# Altium PCB Emstat_system.PcbDoc
Units mil, origin at the board's own origin, x right, y up, seen from the top; angles counter-clockwise.
Board outline 2520 x 1700 mil, 2 copper layers (Top Layer, Bottom Layer); 40 components, 75 nets, 189 pads, 43 vias.
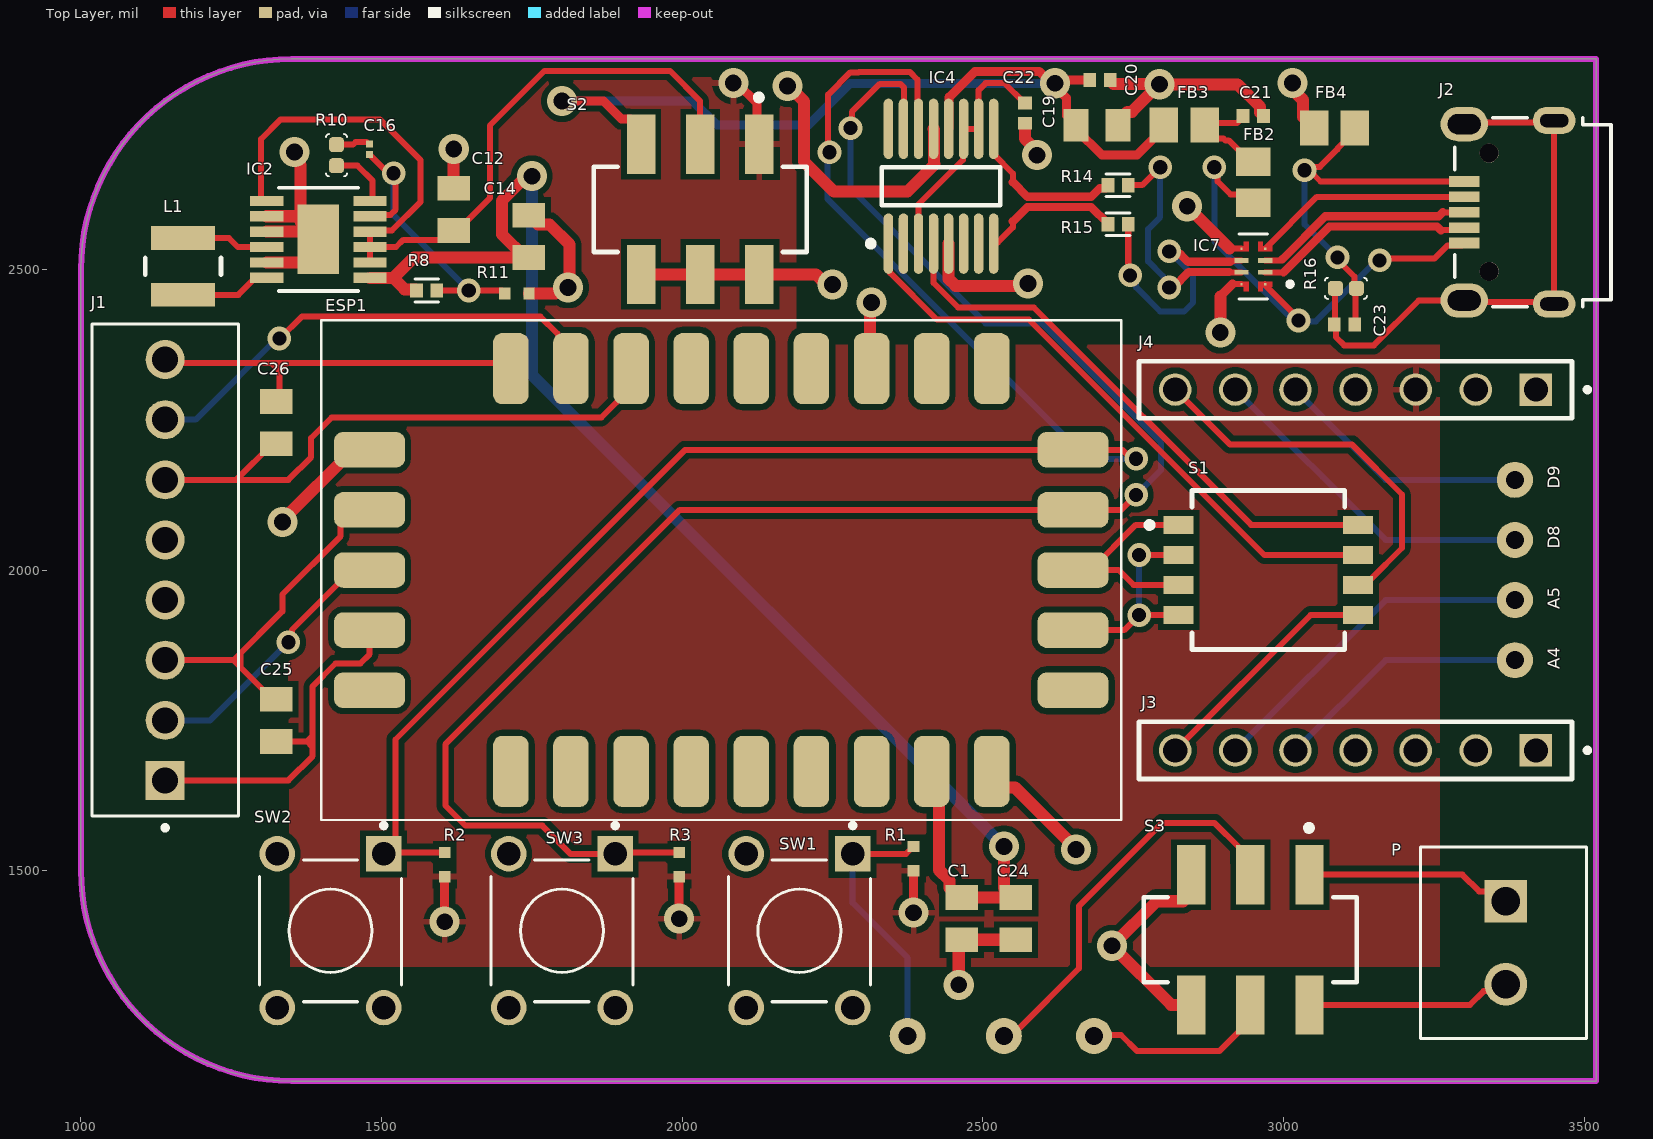
[diagram p0: Top Layer view]
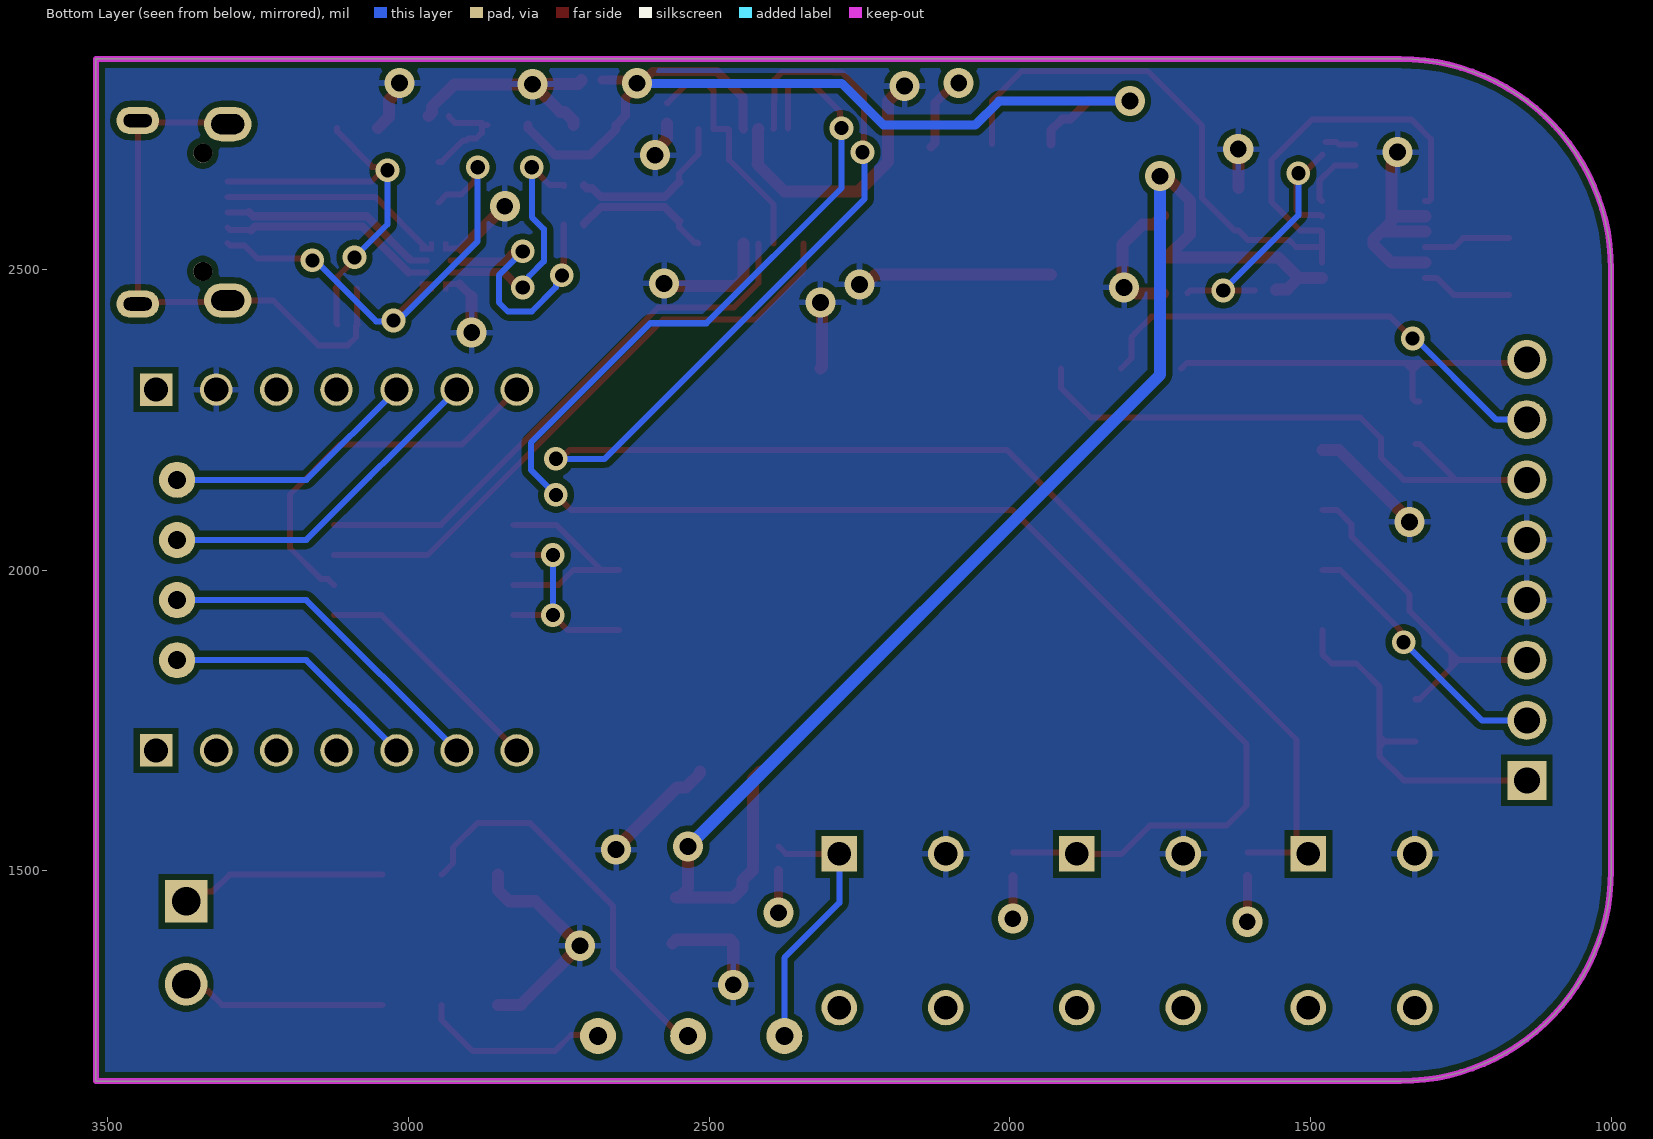
[diagram p1: Bottom Layer view, seen from below]
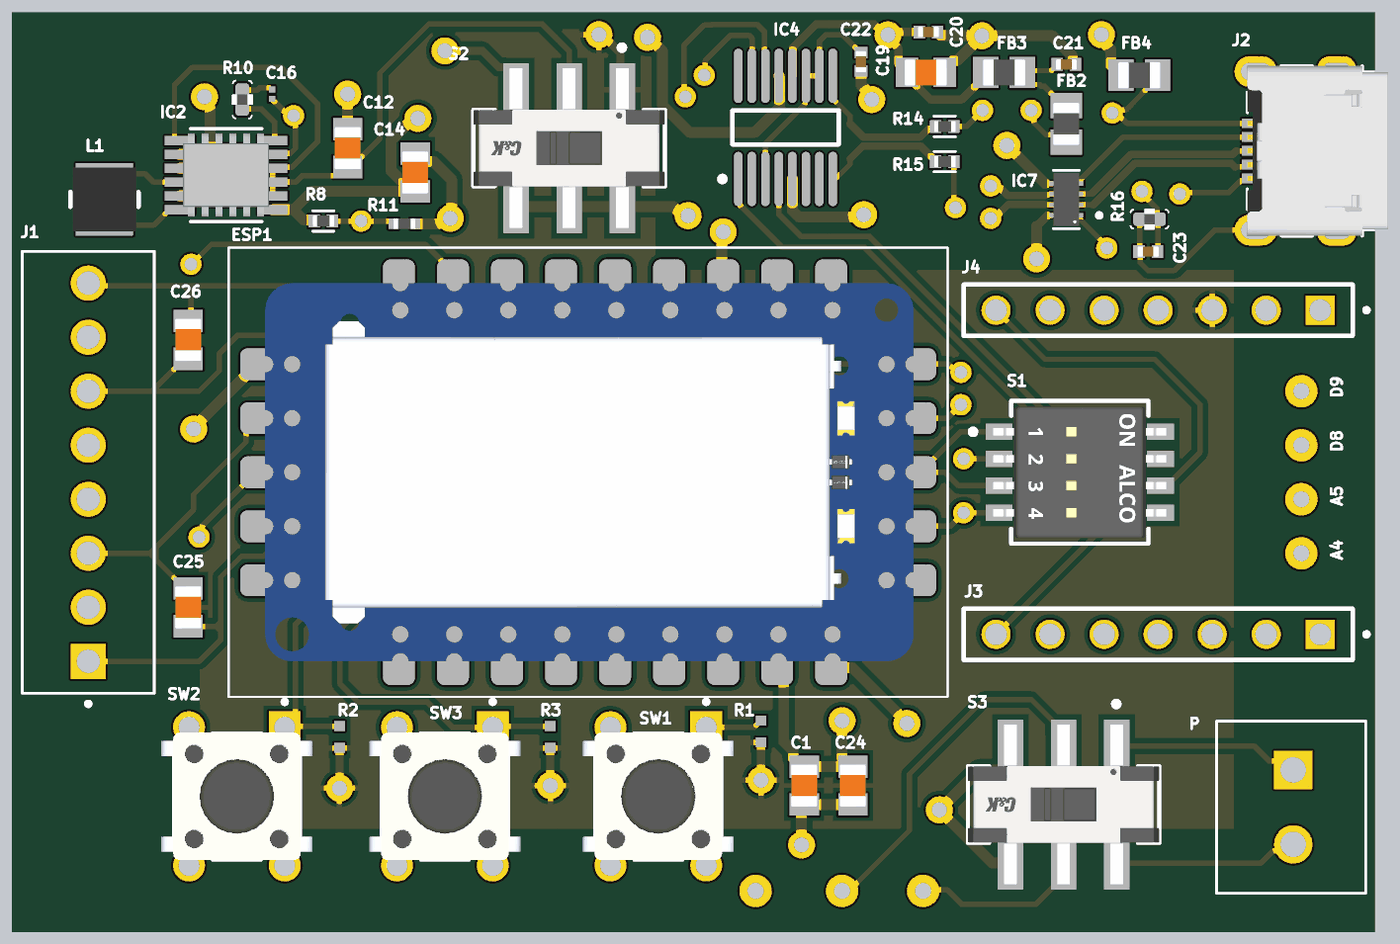
[diagram p2: 3D render of the assembled board from above, using the file's embedded part models]

## Layer stack, top to bottom
Top Solder: solder mask 0.4, Solder Resist, Dk 3.5
Top Layer: signal copper 1.4
Dielectric 1: dielectric 12.6, FR-4, Dk 4.8
Bottom Layer: signal copper 1.4
Bottom Solder: solder mask 0.4, Solder Resist, Dk 3.5

## Board outline
1350,1150 cw(c1350,1500) 1000,1500 1000,2500 cw(c1350,2500) 1350,2850 3520,2850 3520,1150

## Design rules (kind name [scope] priority, off if disabled: settings)
Clearance Clearance_1 [All] p1: gap=5 ignorepadtopadclearanceinfootprint=FALSE
Clearance [All] p2: gap=3 ignorepadtopadclearanceinfootprint=FALSE
MinimumSolderMaskSliver [All] p1: minsoldermaskwidth=5
PolygonConnect [All] p1: connectstyle=Relief reliefconductorwidth=10 reliefentries=4 polygonreliefangle="90 Angle" airgapwidth=10
RoutingVias [All] p1: holewidth=23.62 width=39.37 viastyle="Through Hole" minholewidth=23.62 minwidth=39.37 maxholewidth=23.62 maxwidth=39.37
ShortCircuit ShortCircuit_1 [All] p1: allowed=FALSE
ShortCircuit [Not InAnyNet vs Not InAnyNet] p2: allowed=TRUE
SilkToSilkClearance [All] p1: silktosilkclearance=5
SilkToSolderMaskClearance [IsPad] p1: minsilkscreentomaskgap=5 clearancetoexposedcopper=TRUE
SolderMaskExpansion [All] p1: expansion=4 istentingtop=FALSE
Width [All] p1: maxlimit=30 minlimit=10 preferedwidth=10
26 further rules are at their usual default settings.

## Components (designator, comment, footprint, x,y, rotation, side; value= is the part's Value field where it differs from the comment)
C1 "CL21A106KPCLQNC" CAPC2012X95N 2465,1420.04 r270 top
C12 "CL21A106KPCLQNC" CAPC2012X95N 1620,2600 r90 top
C14 "CL21A106KPCLQNC" CAPC2012X95N 1745,2555 r90 top
C16 "GRM022R61A102KE19L" CAPC0402X22N 1480,2700 r270 top
C19 "CL21A106KPCLQNC" CAPC2012X95N 2690,2740 r0 top
C20 "CL05A104KP5NNNC" CAPC1005X55N 2695,2815 r0 top
C21 "LMK105BJ105KV-F" CAPC1005X55N 2950,2755 r180 top
C22 "CL05A104KP5NNNC" CAPC1005X55N 2570,2760 r270 top
C23 "CL05A104KP5NNNC" CAPC1005X55N 3101.5,2408.5 r180 top
C24 "CL21A106KPCLQNC" CAPC2012X95N 2555,1420.04 r270 top
C25 "CL21A106KPCLQNC" CAPC2012X95N 1325,1750 r90 top
C26 "CL21A106KPCLQNC" CAPC2012X95N 1325,2245 r270 top
ESP1 "EmStat Pico" EmstatPico 2065,2000 r180 top
FB2 "MPZ2012S601AT000" BEADC2012X105N 2950,2645 r90 top
FB3 "MPZ2012S601AT000" BEADC2012X105N 2835,2740 r180 top
FB4 "MPZ2012S601AT000" BEADC2012X105N 3085,2735 r180 top
IC2 "LTC3536EMSE#PBF" MSOP-12_MSE 1395,2550 r0 top
IC4 "" SSOP-16_M 2430.55,2638.33 r90 top
IC7 "ECMF02-4CMX8" FIL_ECMF02-4CMX8 2950,2505 r180 top
J1 "1725711" PHOENIX_1725711 1262.05,1590.94 r90 top
J2 "629105150521" 629105150521 3415,2595 r90 top
J3 "ESQ-107-12-T-S" SAMTEC_ESQ-107-12-T-S 3420,1700 r180 top locked
J4 "ESQ-107-12-T-S" SAMTEC_ESQ-107-12-T-S 3420,2300 r180 top locked
L1 "4.7uH, 1.3A" WE-LQS_3015 1170,2505 r90 top
P "OSTTE020104" OST_OSTTE020104 3370,1380 r270 top
R1 "ERJ2RKF4702X" RES_ERJ2RKF4702X 2385,1520 r270 top
R2 "ERJ2RKF4702X" RES_ERJ2RKF4702X 1605,1510 r270 top
R3 "ERJ2RKF4702X" RES_ERJ2RKF4702X 1995,1510 r270 top
R8 "ERJ-2RKF4992X" RESC1005X40 1575,2465 r180 top
R10 "SMD-RES-100K-5%-1/16W(0402)" R0402 1425,2690 r180 top
R11 "ERJ2RKF1002X" RES_ERJ2RKF1002X 1725,2460 r180 top
R14 "RC0402FR-0727RL" RESC1005X40 2725,2640 r180 top
R15 "RC0402FR-0727RL" RESC1005X40 2725,2575 r180 top
R16 "SMD-RES-100K-5%-1/16W(0402)" R0402 3104,2468.5 r90 top
S1 "" FP-1571983-4-MFG 2975,2000 r270 top
S2 "" FP-JS202011SCQN-MFG 2030,2600 r180 top
S3 "" FP-JS202011SCQN-MFG 2945,1385 r180 top
SW1 "1825910-6" SW_1825910-6-4 2195,1400 r270 top
SW2 "1825910-6" SW_1825910-6-4 1415,1400 r270 top
SW3 "1825910-6" SW_1825910-6-4 1800,1400 r270 top

## Footprints (in the part's own frame and the unit in brackets; to place one, negate y for a bottom-side part, rotate by r counter-clockwise, add the part's x,y. Pads: shape width x height; smd on the part's side, far side on the other; paste and mask are expansions set on the pad)
629105150521 [mm] "Micro USB 2.0 SMT Type B Horizontal 5 Contacts High Current"
  rect 0.45x1.3 smd: 1(-1.3,2.9) 2(-0.65,2.9) 3(0,2.9) 4(0.65,2.9) 5(1.3,2.9)
  round 0.8 hole 0.8 unplated: MH1(-2.5,1.85) MH2(2.5,1.85)
  oval 1.15x1.8 hole 0.55 slot 1.2 at 90 deg: Shell(-3.875,-0.9) Shell(3.875,-0.9)
  oval 1.45x2 hole 0.85 slot 1.4 at 90 deg: Shell(-3.725,2.9) Shell(3.725,2.9)
  silkscreen extent -4,-3.3 4,3.3, body extent -4,-3.3 4,3.3, height 2.75
BEADC2012X105N [mm]
  rect 1.2x1.47 smd: 1(-0.86,0) 2(0.86,0)
  body extent -1,-0.63 1,0.63, height 1.05
CAPC0402X22N [mm]
  rect 0.29x0.3 smd: 1(-0.222,0) 2(0.222,0)
CAPC1005X55N [mm]
  rect 0.54x0.6 smd: 1(-0.432,0) 2(0.432,0)
  body extent -0.5,-0.25 0.5,0.25, height 0.55
CAPC2012X95N [mm]
  rect 1.05x1.38 smd: 1(-0.89,0) 2(0.89,0)
  body extent -1,-0.63 1,0.63, height 0.95
EmstatPico [mm] "EmStat Pico LandPattern"
  rrect50% 3x1.5 smd: 1(-14.859,5.08) 2(-14.859,2.54) 3(-14.859,0) 4(-14.859,-2.54) 5(-14.859,-5.08) 15(14.859,-5.08) 16(14.859,-2.54) 17(14.859,0) 18(14.859,2.54) 19(14.859,5.08)
  rrect50% 1.5x3 smd: 6(-11.43,-8.509) 7(-8.89,-8.509) 8(-6.35,-8.509) 9(-3.81,-8.509) 10(-1.27,-8.509) 11(1.27,-8.509) 12(3.81,-8.509) 13(6.35,-8.509) 14(8.89,-8.509) 20(8.89,8.509) 21(6.35,8.509) 22(3.81,8.509) 23(1.27,8.509) 24(-1.27,8.509) 25(-3.81,8.509) 26(-6.35,8.509) 27(-8.89,8.509) 28(-11.43,8.509)
  silkscreen extent -16.9,-10.56 16.9,10.56, body extent -15.3,-8.89 15.18,8.89, height 2.6
FIL_ECMF02-4CMX8 [mm]
  rect 0.1x0.1 smd paste-1 mask+0: 1(-0.5,0.75) 4(-0.5,-0.75) 5(0.5,-0.75) 8(0.5,0.75)
  rect 0.6x0.2 smd: 2(-0.5,0.25) 3(-0.5,-0.25) 6(0.5,-0.25) 7(0.5,0.25)
  Top Layer region: -0.2,0.65 -0.8,0.65 -0.8,0.85 -0.4,0.85 -0.4,1.05 -0.2,1.05
  Top Layer region: 0.4,0.85 0.8,0.85 0.8,0.65 0.2,0.65 0.2,1.05 0.4,1.05
  Top Layer region: -0.2,-1.05 -0.4,-1.05 -0.4,-0.85 -0.8,-0.85 -0.8,-0.65 -0.2,-0.65
  Top Layer region: 0.8,-0.85 0.4,-0.85 0.4,-1.05 0.2,-1.05 0.2,-0.65 0.8,-0.65
  silkscreen extent -1.65,-1.37 0.6,1.37, body extent -0.6,-1.25 0.6,1.25, height 0.6
FP-1571983-4-MFG [mm]
  rect 0.76x1.27 smd paste+0 mask+0: 1(-1.905,-3.795) 1-1(-1.905,3.795) 2(-0.635,-3.795) 2-1(-0.635,3.795) 3(0.635,-3.795) 3-1(0.635,3.795) 4(1.905,-3.795) 4-1(1.905,3.795)
  silkscreen extent -3.35,-5.14 3.35,3.22, body extent -3.45,-4.53 3.45,4.53, height 0.25
FP-JS202011SCQN-MFG [mm]
  rect 1.2x2.5 smd paste+0 mask+0: 1(-2.5,-2.75) 2(0,-2.75) 3(2.5,-2.75) 4(-2.5,2.75) 5(0,2.75) 6(2.5,2.75)
  silkscreen extent -4.5,-4.85 4.5,1.8, body extent -4.6,-4.1 4.6,4.1, height 0.25
MSOP-12_MSE [mil]
  rect 55x17 smd: 1(-86,64) 2(-86,38.4) 3(-86,12.8) 4(-86,-12.8) 5(-86,-38.4) 6(-86,-64) 7(86,-64) 8(86,-38.4) 9(86,-12.8) 10(86,12.8) 11(86,38.4) 12(86,64)
  rect 69x116 smd paste-78.74: 13(0,0)
  silkscreen extent -66,-86 66,86, body extent -80,-96 80,96, height 17
OST_OSTTE020104 [mm]
  rect 1.8x1.8 hole 1.2: 1(-1.75,0)
  round 1.8 hole 1.2: 2(1.75,0)
  silkscreen extent -4.05,-3.6 4.05,3.4
PHOENIX_1725711 [mm]
  rect 1.65x1.65 / inner round 1.65 / far side rect 1.65x1.65 hole 1.1: 1(1.5,3.1)
  round 1.65 hole 1.1: 2(4.04,3.1) 3(6.58,3.1) 4(9.12,3.1) 5(11.66,3.1) 6(14.2,3.1) 7(16.74,3.1) 8(19.28,3.1)
  silkscreen extent -0.6,0 20.78,6.2
R0402 [mil]
  rrect50% 25x25 smd: 1(0,17.5) 2(0,-17.5)
  silkscreen extent -18,-35 18,35, body extent -20,-10 20,10, height 16
RES_ERJ2RKF1002X [mm]
  rect 0.475x0.5 smd: 1(-0.512,0) 2(0.512,0)
  body extent -0.5,-0.25 0.5,0.25, height 0.35
RES_ERJ2RKF4702X [mm]
  rect 0.475x0.5 smd: 1(-0.512,0) 2(0.512,0)
RESC1005X40 [mm]
  rect 0.54x0.6 smd: 1(-0.43,0) 2(0.43,0)
  silkscreen extent -0.5,-0.48 0.5,0.48, body extent -0.5,-0.25 0.5,0.25, height 0.35
SAMTEC_ESQ-107-12-T-S [mm]
  rect 1.37x1.37 hole 1.02: 01(0,0)
  round 1.37 hole 1.02: 02(2.54,0) 03(5.08,0) 04(7.62,0) 05(10.16,0) 06(12.7,0) 07(15.24,0)
  silkscreen extent -2.27,-1.2 16.77,1.2
SSOP-16_M [mm] "SOP, 16-Leads, Body 4.9x3.9mm, Pitch 0.635mm, IPC Low Density"
  oval 2.55x0.4 smd: 1(-2.425,2.222) 2(-2.425,1.587) 3(-2.425,0.952) 4(-2.425,0.317) 5(-2.425,-0.318) 6(-2.425,-0.953) 7(-2.425,-1.588) 8(-2.425,-2.222) 9(2.425,-2.222) 10(2.425,-1.587) 11(2.425,-0.952) 12(2.425,-0.317) 13(2.425,0.318) 14(2.425,0.953) 15(2.425,1.588) 16(2.425,2.222)
  silkscreen extent -2.55,-2.5 0.8,3.1, body extent -1.99,-2.5 1.99,2.5, height 1.76
SW_1825910-6-4 [mm]
  rect 1.498x1.498 / inner round 1.498 / far side rect 1.498x1.498 hole 0.99: 1(-3.25,2.25)
  round 1.498 hole 0.99: 2(3.25,2.25) 3(-3.25,-2.25) 4(3.25,-2.25)
  silkscreen extent -4.54,-3 3,3, body extent -3,-3.9 3,3.9, height 5.01
WE-LQS_3015 [mm] "SMD Power Inductor, 2-Leads, body 3x3mm"
  rect 1x2.7 smd: 1(-1.2,0) 2(1.2,0)
  silkscreen extent -0.35,-1.6 0.35,1.6, body extent -1.5,-1.5 1.5,1.5, height 1.5

## Part data
C1 C12 C14 C19 C24 C25 C26: "10 ÂµF Â±10% 10V Ceramic Capacitor X5R 0805 (2012 Metric)", Package=Package, Check_prices=https://www.snapeda.com/parts/CL21A106KPCLQNC/Samsung/view-part/?ref=eda, Digi-Key_Part_Number=1276-2402-2-ND, MF=Samsung, MP=CL21A106KPCLQNC, Purchase-URL=https://pricing.snapeda.com/search/part/CL21A106KPCLQNC/?ref=eda, SnapEDA_Link=https://www.snapeda.com/parts/CL21A106KPCLQNC/Samsung/view-part/?ref=snap
C16 J1 J3 J4 R1 R2 R3: Package=None, Availability=Unavailable, Price=None
  C16: MP=GRM022R61A102KE19L
  J1: MF="Phoenix Contact", MP=1725711
  J3 J4: MP=ESQ-107-12-T-S
  R1 R2 R3: MP=ERJ2RKF4702X
C20 C22 C23: "0.1ÂµF Â±10% 10V Ceramic Capacitor X5R 0402 (1005 Metric)", Package="0402 Samsung", Availability=Good, Check_prices=https://www.snapeda.com/parts/CL05A104KP5NNNC/Samsung%20Electro-Mechanics/view-part/3598286/?ref=eda, MF="Samsung Electro-Mechanics", MP=CL05A104KP5NNNC, Price=None, Purchase-URL=https://pricing.snapeda.com/search/part/CL05A104KP5NNNC/?ref=eda, SnapEDA_Link=https://www.snapeda.com/parts/CL05A104KP5NNNC/Samsung%20Electro-Mechanics/view-part/3598286/?ref=snap
  C22: Supplier 1=Avnet, Supplier Part Number 1=CL05A104KP5NNNC
C21: "1ÂµF Â±10% 10V Ceramic Capacitor X5R 0402 (1005 Metric)", Package="1005 Taiyo Yuden", Availability=Good, Check_prices=https://www.snapeda.com/parts/LMK105BJ105KV-F/Taiyo%20Yuden/view-part/1836611/?ref=eda, MF="Taiyo Yuden", MP=LMK105BJ105KV-F, Price=None, Purchase-URL=https://pricing.snapeda.com/search/part/LMK105BJ105KV-F/?ref=eda, SnapEDA_Link=https://www.snapeda.com/parts/LMK105BJ105KV-F/Taiyo%20Yuden/view-part/1836611/?ref=snap
FB2 FB3 FB4: "600 Ohms @ 100MHz 1 Power Line Ferrite Bead 0805 (2012 Metric) 2A 100mOhm", Package="0805 TDK", Availability=Good, Check_prices=https://www.snapeda.com/parts/MPZ2012S601AT000/TDK-Lambda%20Americas%20Inc/view-part/259003/?ref=eda, MF=TDK, MP=MPZ2012S601AT000, Price=None, Purchase-URL=https://pricing.snapeda.com/search/part/MPZ2012S601AT000/?ref=eda, SnapEDA_Link=https://www.snapeda.com/parts/MPZ2012S601AT000/TDK-Lambda%20Americas%20Inc/view-part/259003/?ref=snap
IC2: "1A Low Noise, Buck-Boost DC/DC Converter", Package="MSOP -12 Analog Devices", Availability="In Stock", Check_prices=https://www.snapeda.com/parts/LTC3536EMSE%23PBF/Analog+Devices/view-part/?ref=eda, MF="Analog Devices", MP=LTC3536EMSE#PBF, Price=None, Purchase-URL=https://pricing.snapeda.com/search/part/LTC3536EMSE#PBF/?ref=eda, SnapEDA_Link=https://www.snapeda.com/parts/LTC3536EMSE%23PBF/Analog+Devices/view-part/?ref=snap
IC4: library part CMP-0248-00025-2, "USB to Basic UART Interface Chip, UHCI/OHCI/EHCI Compatible, USB 2.0 Compatible, -40 to +85 degC, 16-Pin SSOP, Pb-Free, Tube", Manufacturer=FTDI, PartNumber=FT230XS-U, Supplier Part Number 1=768-1154-5-ND, Code_JEDEC=MO-137-AB, ComponentLink1Description="Manufacturer URL", ComponentLink1URL=http://www.ftdichip.com/, ComponentLink2Description=Datasheet, ComponentLink2URL=http://www.ftdichip.com/Support/Documents/DataSheets/ICs/DS_FT230X.pdf, ComponentLink3Description="FT230X Product Page", ComponentLink3URL=www.ftdichip.com/Products/ICs/FT230X.html, DatasheetVersion="ver 1.2, Feb-2013", PackageDescription="16-Pin Small Outline Package, 8.6 x 3.9 mm Body, 0.635 mm Pitch", PackageReference=SSOP-16, PackageVersion=Feb-13, RevisionNote="DatasheetVersion updated to 1.2 Feb-2013", Supplier 1=Digikey
IC7: "2 Line Common Mode Choke Surface Mount DCR 4Ohm", Package="UFDFN-8 STMicroelectronics", Check_prices=https://www.snapeda.com/parts/ECMF02-4CMX8/STMicroelectronics/view-part/?ref=eda, MF=STMicroelectronics, MP=ECMF02-4CMX8, SnapEDA_Link=https://www.snapeda.com/parts/ECMF02-4CMX8/STMicroelectronics/view-part/?ref=snap
J2: "WR-COM Micro USB 2.0 SMT Type B Horizontal 5 Contacts High Current", Manufacturer="Wurth Elektronik", Operating Temperature Max=85°C, Operating Temperature Min=-40°C, Rated Current=3A, Working Voltage="30V (AC)", Application="Micro USB 2.0", Category="Input/Output Connectors", ComponentLink1Description="Website Link", ComponentLink1URL=https://www.we-online.com/redexpert/article/629105150521?ad, ComponentLink2Description="Datasheet Link", ComponentLink2URL=https://www.we-online.com/redexpert/spec/629105150521?ad, Gender=Receptacle, Interface Type="Type B", Manufacturer Part Number=629105150521, Match Code=WR-USB, Mount="Surface Mount", Number of Pins=5, Number of Ports=1, Orientation=Horizontal, Packaging="Tape and Reel"
L1: library part 74404032047, "WE-LQS SMT Power Inductor, size 3015, 4.7uH, 1.3A, 0.096Ohm", Case/Size Code=3015, DC Resistance=0.096Ohm, Inductance=4.7uH, Manufacturer="Wurth Elektronik", Operating Temperature Max=125°C, Operating Temperature Min=-40°C, Rated Current=1.3A, Saturation Current=1.2A, Self Resonant Frequency=56MHz, Category="Power Inductors", ComponentLink1Description="Website Link", ComponentLink1URL=https://www.we-online.com/redexpert/article/74404032047?ad, ComponentLink2Description="Datasheet Link", ComponentLink2URL=https://www.we-online.com/redexpert/spec/74404032047?ad, Height=1.5mm, Length=3mm, Manufacturer Part Number=74404032047, Match Code=WE-LQS, Mount="Surface Mount", Packaging="Tape and Reel", Width=3mm
P: "2 Position Wire to Board Terminal Block Horizontal with Board 0.138 _3.50mm_ Through Hole", Package=None, Supplier Part Number 1=ED2740-ND, Digi-Key_Part_Number=ED2740-ND, Digi-Key_Purchase_URL=https://www.digikey.com/product-detail/en/on-shore-technology-inc/OSTTE020104/ED2740-ND/2351816?utm_source=snapeda&utm_medium=aggregator&utm_campaign=symbol, MF="On Shore", MP=OSTTE020104, SnapEDA_Link=https://www.snapeda.com/parts/OSTTE020104/On%20Shore%20Technology%20Inc./view-part/274621/?ref=snap, Supplier 1=Digikey
R8: "49.9 kOhms 1% 0.1W, 1/10W Chip Resistor 0402 (1005 Metric) Automotive AEC-Q200 Thick Film", Package="1005-2 Panasonic", Check_prices=https://www.snapeda.com/parts/ERJ-2RKF4992X/Panasonic+Electronic+Components/view-part/?ref=eda, MF="Panasonic Electronic", MP=ERJ-2RKF4992X, SnapEDA_Link=https://www.snapeda.com/parts/ERJ-2RKF4992X/Panasonic+Electronic+Components/view-part/?ref=snap
R10 R16: "100 kOhms Â±5% 0.063W, 1/16W Chip Resistor 0402 (1005 Metric) Moisture Resistant Thick Film", Package="0402 Yageo", Check_prices=https://www.snapeda.com/parts/RC0402JR-07100KL/Yageo/view-part/?ref=eda, Digi-Key_Part_Number=311-100KJRTR-ND, MF=Yageo, MP=RC0402JR-07100KL, Purchase-URL=https://pricing.snapeda.com/search?q=RC0402JR-07100KL&ref=eda, SnapEDA_Link=https://www.snapeda.com/parts/RC0402JR-07100KL/Yageo/view-part/?ref=snap
R11: "10 kOhms 1% 0.1W, 1/10W Chip Resistor 0402 (1005 Metric) Automotive AEC-Q200 Thick Film", Package="1005-2 Panasonic", Availability="In Stock", Check_prices=https://www.snapeda.com/parts/ERJ-2RKF1002X/Panasonic%20Electronic%20Components/view-part/78636/?ref=eda, MF=Panasonic, MP=ERJ-2RKF1002X, Price=None, SnapEDA_Link=https://www.snapeda.com/parts/ERJ-2RKF1002X/Panasonic%20Electronic%20Components/view-part/78636/?ref=snap
R14 R15: "Surface Mount Thick Film Resistor, RC Series, 27 ohm, 63 mW, - 1%, 50 V, 0402 [1005 Metric]", Package="1005 Panasonic Electronic Components", Digi-Key_Part_Number=YAG3086CT-ND, Digi-Key_Purchase_URL=https://www.digikey.com/product-detail/en/yageo/RC0402FR-0727RL/YAG3086CT-ND/5281951?utm_source=snapeda&utm_medium=aggregator&utm_campaign=symbol, MF=Yageo, MP=RC0402FR-0727RL, SnapEDA_Link=https://www.snapeda.com/parts/RC0402FR-0727RL/Yageo/view-part/938293/?ref=snap
S1: library part 1571983-4, "SWITCH SLIDE DIP SPST 25MA 24V", Package=None, Supplier Part Number 1=9787847, Availability=Unavailable, MP=1571983-4, Price=None, Supplier 1="Future Electronics"
S2 S3: library part CMP-2000-05087-3, "SWITCH SLIDE DPDT 300MA 6V", Actuator Color=Black, Contact Current Rating=300mA, Contact Resistance=70mR, Flammability Rating="UL94 V-2", Max Operating Temperature=85°C, Max Voltage Rating (DC)=6V, Min Operating Temperature=-20°C, Package Quantity=1, Actuator Length=2mm, Actuator Material=Nylon, Actuator Type=Standard, Contact Material="Copper Alloy", Contact Plating=Silver, Current Rating=300mA, Depth=7.5mm, Electrical Life=5000Cycles, Housing Material=Nylon, Lead Free="Lead Free", Length=9mm, Max Current Rating=300mA, Mount="Surface Mount", Orientation=Vertical, Packaging="Tape and Reel", Radiation Hardening=No, REACH SVHC="No SVHC", Series=JS, Switch Function=On-On, Switch Travel=2mm, Termination="Gull Wing", Throw Configuration=DPDT, Voltage Rating (DC)=6V
SW1 SW2 SW3: "Switch Push Button OFF (ON) SPST Round Button 0.05A 24VDC Momentary Contact PC Pins Thru-Hole", Package=None, Check_prices=https://www.snapeda.com/parts/1825910-6/TE+Connectivity+ALCOSWITCH+Switches/view-part/?ref=eda, Digi-Key_Part_Number=450-1650-ND, MF="TE Connectivity", MP=1825910-6, Purchase-URL=https://pricing.snapeda.com/search/part/1825910-6/?ref=eda, SnapEDA_Link=https://www.snapeda.com/parts/1825910-6/TE+Connectivity+ALCOSWITCH+Switches/view-part/?ref=snap

## Free pads (board coordinates)
  round 60 hole 30: 4(2375,1225) 4(2535,1225) 5(2685,1225) 6(3385,2150) 7(3385,2050) 8(3385,1950) 9(3385,1850)

## Via types
v1: diameter 50, hole 28, Top Layer to Bottom Layer, 24 vias
v2: diameter 39.37, hole 23.62, Top Layer to Bottom Layer, 19 vias

## Nets (pads, with @x,y where several pads share a name; then routed paths per layer and width w, separated by ;. In a path a pad name is that pad's centre, name@x,y a point inside that pad or via, vN(x,y) a via of type N, cw(c..) or ccw(c..) an arc to the next point about the centre after c; other vN are vias at no path point)
3.3V_Arduino: J4.03 R1.2 R2.2 R3.2 S2.1 | length 343.7
  Top Layer w15: v1(1605,1415) R2.2 ; v1(1995,1420) R3.2 ; v1(2085,2810) 2090.89,2810 2124.72,2776.17 2124.72,2710.06 S2.1@2131.3,2703.48 ; v1(2385,1430) R1.2
3.6V_Power: C1.1 C14.1 C24.1 ESP1.27 IC2.7 R8.2 | length 2349.3
  Top Layer w20: IC2.7 1519.26,2486 1538.3,2466.96 1556.11,2466.96 R8.2@1557.58,2465.49 ; 1519.93,2486 1553.89,2519.96 C14.1@1735,2519.96 ; C14.1 1738.5,2519.96 1699.99,2558.47 1699.99,2614.08 1740.91,2655 v1(1750,2655) ; ESP1.27 2427.23,1652.77 2427.23,1501.12 2444.61,1483.74 2444.61,1470.75 C1.1@2461.19,1454.17 ; C1.1 C24.1@2550.67,1455.08 ; v1(2535,1540) 2535,1470.75 C24.1@2550.67,1455.08 ; C24.1 C24.1@2550.67,1455.08
  Bottom Layer w20: v1(1750,2655) 1750,2325 v1(2535,1540)
5V_USB: C19.1 C20.1 FB3.2 IC4.12 S2.3 | length 1629.4
  Top Layer w15: v1(1800,2780) 1869.15,2780 1899.2,2749.95 1912.95,2749.95 1931.57,2731.32 S2.3 ; IC4.12 2444.15,2734.9 2444.15,2786.33 2487.24,2829.42 2593.71,2829.42 2608.14,2815 C20.1 ; v1(2620,2809.59) 2620,2804.18 2639.29,2784.88 2639.29,2755.67 C19.1 2654.96,2733.5 2698.46,2690 2756.46,2690 2801.14,2734.69 FB3.2
  Bottom Layer w15: v1(1800,2780) 2017.91,2780 2057.91,2740 2210,2740 2279.59,2809.59 v1(2620,2809.59)
Arduino_RX0: J4.07 S1.3-1 | length 636.8
  Top Layer w10: J4.07 2910.94,2209.06 3113.71,2209.06 3197.26,2125.51 3197.26,2036.67 3145.54,1984.96 3134.37,1984.96 S1.3-1
Arduino_TX0: J3.07 S1.4-1 | length 397.6
  Top Layer w10: J3.07 3045,1925 S1.4-1
BAT+: pad.4@2535,1225 S3.2 | length 669.1
  Top Layer w10: pad.4@2535,1225 2539.54,1229.54 2539.62,1229.86 2540.71,1230.95 2543.64,1233.88 2556.53,1233.88 2659.8,1337.15 2659.8,1441.02 2798.3,1579.52 2885.25,1579.52 2926.38,1538.4 2926.38,1511.89 S3.2
BAT-: pad.5 S3.5 | length 318.3
  Top Layer w10: pad.5 2686.55,1226.55 2729.79,1226.55 2756.16,1200.19 2894.05,1200.19 2945,1251.14 S3.5
CE0: C25.1 ESP1.18 J1.1 | length 597.7
  Top Layer w10: J1.1 1345,1650 1385.27,1690.27 1385.27,1720.82 ; C25.1 1379.41,1714.96 1385.27,1720.82 ; ESP1.18 1480,1860 1464.53,1844.53 1423.38,1844.53 1385.27,1806.42 1385.27,1720.82
CE1: C26.2 ESP1.12 J1.6 | length 980.3
  Top Layer w10: J1.6 1258.54,2150 ; C26.2 1318.5,2209.96 1258.54,2150 ; ESP1.12 1915,2303.08 1865.64,2253.72 1416.88,2253.72 1382.77,2219.6 1382.77,2187.77 1345,2150 1258.54,2150
FTDI_RX: IC4.4 S1.1-1 | length 938.3
  Top Layer w10: IC4.4 2418.05,2477.66 2459.07,2436.64 2584.83,2436.64 2946.47,2075 S1.1-1
FTDI_TX: IC4.1 S1.2-1 | length 1022.6
  Top Layer w10: IC4.1 2343.05,2498.97 2345.92,2496.1 2345.92,2494.26 2423.55,2416.64 2576.55,2416.64 2968.19,2025 S1.2-1
GND: C1.2 C12.2 C14.2 C19.2 C20.2 C21.1 C22.2 C24.2 ESP1.8 ESP1.15 ESP1.28 FB4.2 IC2.2 IC2.3 IC2.5 IC2.13 IC4.5 IC4.13 IC7.5 IC7.8 J1.4 J1.5 J4.02 R11.1 S2.4 S2.5 S2.6 S3.3 S3.6 SW1.3 SW2.3 SW3.3 | length 3471.5
  Top Layer w10: 2910.47,2534.53 IC7.5 ; 2915.22,2475.47 IC7.8
  Top Layer w15: 2895,2455.25 2915.22,2475.47
  Top Layer w20: IC2.5 1365.5,2511.6 1395,2541.1 IC2.13 IC2.13@1382.2,2562.8 ; IC2.3 IC2.13@1382.2,2562.8 ; IC2.2 IC2.13@1365.5,2588.4 ; v1(1335,2080) 1335,2082.26 1452.74,2200 ESP1.15 ; v1(1355,2695) 1355,2684.18 1365.5,2673.68 IC2.13@1365.5,2588.4 ; C12.2 v1(1620,2700) ; C14.2 1759.98,2575.06 1779.07,2575.06 1812.51,2541.62 1812.51,2472.51 v1(1810,2470) 1799.18,2470 1789.18,2460 R11.1 ; S2.6 S2.5 S2.4 2222.44,2491.73 2239.18,2475 v1(2250,2475) ; v1@2187.15,2795.62 2187.15,2794.95 2202.69,2779.41 2202.69,2679.11 2252.42,2629.38 2374.38,2629.38 2420,2675 2419.15,2675.85 2419.15,2732.7 IC4.13 ; ESP1.8 2312.49,2337.51 2312.49,2442.49 v1(2315,2445) ; IC4.5 2443.05,2484.33 2454.77,2472.62 2570.98,2472.62 v1(2575,2476.64) ; v1(2460,1310.04) 2460,1380 C1.2 C24.2 C24.2@2561.19,1378.81 ; ESP1.28 2515,1662.01 2538.78,1638.23 2553.67,1638.23 2655,1536.9 v1(2655,1535) ; C22.2 2570,2717.36 2590,2697.36 v1(2590,2690) ; C20.2 2712.01,2814.18 2717.64,2808.55 v1@2781.77,2808.55 ; C19.2@2725.82,2740 2725.82,2747.27 2740.71,2762.17 2747.98,2762.17 v1(2793.75,2807.93) 2923.72,2807.93 2961.38,2770.27 2961.38,2760.63 C21.1 ; v1(2840,2605) 2910.47,2534.53 ; S3.6@2851.57,1276.73 S3.6 2813.27,1276.73 v1(2715,1375) 2789.06,1449.06 2832.95,1449.06 2851.57,1467.68 S3.3@2851.57,1493.27 ; v1@2895,2385 v1(2895,2395) 2895,2455.25 ; v1(3015,2810) 3015,2799.18 3032.52,2781.66 3032.52,2753.62 FB4.2 ; IC2.13@1365.5,2588.4 1365.5,2579.5 IC2.13@1382.2,2562.8
  other v1: 2175,2805
GND_BAT: P.2 S3.4 | length 320.7
  Top Layer w10: S3.4 3310.42,1276.73 3333.14,1299.46 3341.88,1299.46 3344.79,1302.36 P.2@3344.79,1311.1
NetC12_1: C12.1 IC2.1 IC2.8 IC2.9 IC2.10 S2.2 | length 1474.9
  Top Layer w10: IC2.1 1303.06,2614 1299.56,2617.5 1299.56,2716.87 1331.74,2749.05 1497.51,2749.05 1564.51,2682.06 1564.51,2612.01 1517.4,2564.9 1483.1,2564.9 IC2.10 IC2.9 ; IC2.8 IC2.9 ; S2.2 2030,2780 1980,2830 1770.71,2830 1679.99,2739.28 1679.99,2618.46 1626.5,2564.96 C12.1 1604.33,2549.29 1536.15,2549.29 1524.06,2537.2 IC2.9
NetC16_1: C16.1 R10.2 | length 51.7
  Top Layer w10: R10.2 1452.5,2707.5 1456.97,2711.97 C16.1@1474.84,2711.97
NetC16_2: C16.2 IC2.11 R8.1 R11.2 | length 519.1
  Top Layer w10: C16.2 1480,2690.55 1523.5,2647.05 1523.5,2599.29 1514.71,2590.5 1483.1,2590.5 IC2.11 ; R8.1 v2(1645,2465) 1700.33,2465 1704.84,2460.49 R11.2
  Bottom Layer w10: v2(1520,2660) 1520,2590 v2(1645,2465)
NetC21_2: C21.2 FB2.2 FB3.1 | length 174.5
  Top Layer w10: FB3.1 2878.06,2740 2878.06,2727.13 2887.48,2717.72 2900.35,2717.72 2903.3,2714.76 2908.78,2714.76 2944.69,2678.86 FB2.2 ; FB3.1@2878.06,2743.32 2922.5,2743.32 2932.99,2753.82 C21.2
NetC22_1: C22.1 IC4.3 IC4.10 IC4.11 | length 406.5
  Top Layer w10: IC4.3 2393.05,2608.05 2466.95,2681.95 2466.95,2732.7 IC4.11 IC4.10 2493.05,2798.03 2504.7,2809.67 2536.15,2809.67 2568.82,2777.01 C22.1
NetC23_1: C23.1 FB4.1 J2.5 R16.2 | length 684.5
  Top Layer w10: v2(3090,2520) 3090,2516.2 3118.32,2487.88 3118.32,2471.68 R16.2 ; C23.1 3120,2410 R16.2@3120,2470 ; FB4.1 3118.86,2729.69 3089.76,2700.59 3089.76,2699.85 3060.53,2670.62 3040.62,2670.62 v2(3035,2665) 3042.95,2665 3061.77,2646.18 J2.5
  Bottom Layer w10: v2(3035,2665) 3035,2575 v2(3090,2520)
NetC23_2: C23.2 J2.Shell R16.1 | length 942.2
  Top Layer w10: C23.2 3085.49,2409.51 3085.49,2467.5 R16.1 ; C23.2@3084.76,2408.23 3087.09,2405.9 3087.09,2387.55 3101.04,2373.6 3150.26,2373.6 3225,2448.35 3300.83,2448.35 3303.78,2445.39 3447.48,2445.39 3450.43,2442.44 3450.43,2747.56 3447.48,2744.61 3303.78,2744.61 J2.Shell@3300.83,2741.65
NetESP1_1: ESP1.1
NetESP1_6: ESP1.6
NetESP1_7: ESP1.7
NetESP1_9: ESP1.9
NetESP1_10: ESP1.10
NetESP1_11: ESP1.11
NetESP1_19: ESP1.19
NetESP1_20: ESP1.20
NetESP1_21: ESP1.21
NetESP1_22: ESP1.22
NetESP1_23: ESP1.23
NetESP1_24: ESP1.24
NetESP1_25: ESP1.25
NetESP1_26: ESP1.26
NetFB2_1: FB2.1 IC7.1 J2.1 | length 838.3
  Top Layer w10: v2(2885,2670) 2890.39,2664.61 2890.39,2646.34 2911.92,2624.81 2936.33,2624.81 FB2.1 ; IC7.1 2969.68,2473.96 3025,2418.65 v2(3025,2415) ; v2@3165.62,2510.62 3172.87,2517.87 3251.18,2517.87 3273.28,2539.96 3296.97,2539.96 J2.1
  Bottom Layer w10: v2@2885.76,2681.9 2885.76,2546.16 3006.43,2425.49 3006.57,2425.49 3017.05,2415 v2(3025,2415) ; v2@3025.42,2413.63 3053.83,2413.63 3155.2,2515 v2(3160,2515)
NetIC2_4: IC2.4 L1.2 | length 145.2
  Top Layer w10: L1.2 1245.85,2552.24 1260.9,2537.2 IC2.4
NetIC2_6: IC2.6 L1.1 | length 150.7
  Top Layer w10: L1.1 1261.76,2457.76 1290,2486 IC2.6
NetIC2_12: IC2.12 R10.1 | length 105.8
  Top Layer w10: R10.1 1460,2672.5 1485,2647.5 1485,2617.5 1481.5,2614 IC2.12
NetIC4_2: IC4.2
NetIC4_6: IC4.6
NetIC4_7: IC4.7
NetIC4_8: IC4.8 R15.2 | length 233.9
  Top Layer w10: IC4.8 2520.2,2545 2525,2545 2550,2570 2550,2580
  Top Layer w13.7: 2550,2580 2574,2604 2680.25,2604 2708.07,2576.18 R15.2
NetIC4_9: IC4.9 R14.2 | length 278.9
  Top Layer w10: IC4.9 2518.05,2691.47 2550,2659.52 2550,2645
  Top Layer w13.7: 2550,2645 2574.3,2620.7 2680.26,2620.7 2694.6,2635.04 2704.29,2635.04 2708.07,2638.82 R14.2
NetIC4_16: IC4.16
NetIC7_2: IC7.2 J2.2 | length 367.4
  Top Layer w10: IC7.2 2999.98,2495.16 ; 3262.07,2564.88 3262.74,2565.55 3296.97,2565.55 J2.2
  Top Layer w13.7: 2999.98,2495.16 3076.38,2571.55 3255.39,2571.55 3262.07,2564.88
NetIC7_3: IC7.3 J2.3 | length 364.3
  Top Layer w10: IC7.3 2996.05,2514.84 2998.1,2516.9 ; 3265,2595 J2.3
  Top Layer w13.7: 2998.1,2516.9 3069.67,2588.46 3258.46,2588.46 3265,2595
NetIC7_4: IC7.4 J2.4 | length 366.8
  Top Layer w10: IC7.4 3055.75,2620.59 J2.4
NetIC7_6: IC7.6 R15.1 | length 434.4
  Top Layer w10: 2741.93,2510.54 R15.1 ; 2911.73,2512.56 2912.95,2513.78 2917.74,2513.78 2918.8,2514.84 IC7.6
  Top Layer w13.7: v2(2810,2530) 2814.91,2525.09 2829.16,2525.09 2841.69,2512.56 2911.73,2512.56
  Bottom Layer w10: v2@2750,2490 2755,2485 2755,2470 2795,2430 2835,2430 2850,2445 2850,2490 v2(2810,2530)
  other v2: 2745,2490
NetIC7_7: IC7.7 R14.1 | length 419.7
  Top Layer w10: R14.1@2741.93,2638.82 R14.1 2765,2640 v2(2795,2670) ; 2910.67,2494.66 2911.17,2495.16 IC7.7
  Top Layer w13.7: v2(2810,2470) 2816.95,2470 2842.49,2495.54 2909.8,2495.54
  Bottom Layer w10: v2(2795,2670) 2795,2586.86 2775,2566.86 2775,2513.47 2799.71,2488.76 2799.71,2488.24 2810,2477.95 v2(2810,2470)
NetJ3_01: J3.01
NetJ3_02: J3.02
NetJ3_03: J3.03
NetJ3_04: J3.04
NetJ3_05: J3.05 pad.9 | length 427.1
  Bottom Layer w10: J3.05 3170,1850 pad.9
NetJ3_06: J3.06 pad.8 | length 568.6
  Bottom Layer w10: J3.06 3170,1950 pad.8
NetJ4_01: J4.01
NetJ4_04: J4.04
NetJ4_05: J4.05 pad.6 | length 427.1
  Bottom Layer w10: J4.05 3170,2150 pad.6
NetJ4_06: J4.06 pad.7 | length 773.6
  Bottom Layer w10: 3065,2155 J4.06 3170,2050 pad.7
NetSW1_2: SW1.2
NetSW1_4: SW1.4
NetSW2_2: SW2.2
NetSW2_4: SW2.4
NetSW3_2: SW3.2
NetSW3_4: SW3.4
PICO_DWN: ESP1.4 IC4.15 R3.1 SW3.1 | length 2945.8
  Top Layer w10: R3.1 1890.79,1530.16 SW3.1 1814.02,1527.95 1767.29,1574.68 1639.53,1574.68 1605.94,1608.28 1605.94,1709.87 1996.07,2100 ESP1.4 2730,2100 v2(2755,2125) ; v2@2279.7,2735.3 2282.11,2737.71 2282.11,2761.94 2328.69,2808.52 2362.81,2808.52 2368.67,2802.66 IC4.15@2368.67,2734.42
  Bottom Layer w10: v2(2280,2735) 2280,2635 2504.58,2410.42 2597.76,2410.42 2796.57,2211.62 2796.57,2166.57 v2(2755,2125)
PICO_RST: ESP1.5 IC4.14 R2.1 SW2.1 | length 2857.5
  Top Layer w10: SW2.1@1501.08,1530.45 1523.07,1552.44 1523.07,1718.07 2005,2200 ESP1.5 2732.05,2200 2747.05,2185 v2(2755,2185) ; SW2.1 1505.79,1530.16 R2.1 ; v2(2245,2695) 2242.64,2697.36 2242.64,2790.62 2279.7,2827.68 2293.16,2827.68 2294,2828.52 2378.53,2828.52 2391.24,2815.81 2391.24,2781.99 2391.95,2781.28 2391.95,2734.9 IC4.14
  Bottom Layer w10: v2(2245,2695) 2241.39,2691.39 2241.39,2617.4 2673.79,2185 v2(2755,2185)
PICO_RX: ESP1.2 S1.2 S1.4 | length 351.5
  Top Layer w10: ESP1.2 2735,1900 v2(2760,1925) S1.4 ; v2(2760,2025) S1.2
  Bottom Layer w10: v2(2760,1925) v2(2760,2025)
PICO_TX: ESP1.3 S1.1 S1.3 | length 363.1
  Top Layer w10: ESP1.3 ESP1.3@2679.53,2000 ; S1.3 2751.04,1975 2726.04,2000 ESP1.3@2679.53,2000 ; S1.1 2754.53,2075 ESP1.3@2679.53,2000
POWER_BAT: P.1 S3.1 | length 345
  Top Layer w10: S3.1 3297.61,1493.27 3325.42,1465.46 3353.44,1465.46 P.1
RE0: C25.2 ESP1.16 J1.3 | length 570
  Top Layer w10: J1.3 1253.54,1850 1253.67,1849.88 ; C25.2 1318.5,1785.04 1253.67,1849.88 ; ESP1.16 1455.76,2100 1431.97,2076.22 1431.97,2056.22 1335,1959.24 1335,1931.21 1253.67,1849.88
RE1: C26.1 ESP1.14 J1.8 | length 654.5
  Top Layer w10: J1.8 1145.28,2344.72 1330,2344.72 ; C26.1@1318.5,2280.04 C26.1 1330,2285.04 1330,2344.72 ; ESP1.14 1705.28,2344.72 1330,2344.72
RST: pad.4@2375,1225 R1.1 SW1.1 | length 447.3
  Top Layer w10: SW1.1 2372.3,1527.95 2384.51,1540.16 R1.1
  Bottom Layer w10: SW1.1 2283.58,1446.42 2375,1355 pad.4@2375,1225
WE0: ESP1.17 J1.2 | length 452.1
  Top Layer w10: v2(1345,1880) 1350.62,1885.62 1350.62,1900.15 1450.47,2000 ESP1.17
  Bottom Layer w10: J1.2 1215,1750 v2(1345,1880)
WE1: ESP1.13 J1.7 | length 811.6
  Top Layer w10: v2(1330,2385) 1330.94,2385 1367.45,2421.51 1764.07,2421.51 1792.22,2393.36 1792.22,2392.59 1797.79,2387.02 1797.79,2352.21 ESP1.13
  Bottom Layer w10: J1.7 1190.85,2250 v2@1335.04,2394.19
pads on no net: J2.MH1 J2.MH2

## Polygon pours and split planes (outlines as drawn)
3.3V_Arduino on Top Layer "3.3V_ARDUINO_L01_P002" (solid, remove dead copper, pour order 2): 1348.5,1340 1530,1340 3260,1340 3260,2200 3260,2375 2190,2375 2190,2820 1336.81,2820
GND on Bottom Layer "GND_L02_P006" (solid, remove dead copper, pour order 6): 1349.38,1157.92 cw(c1346.88,1495.42) 1009.38,1492.92 1009.38,2517.92 cw(c1351.3,2505.99) 1339.38,2847.92 3519.38,2847.92 3519.38,1157.92

## Keep-outs
Keep-Out Layer:
  the board outline again, w10

## Other copper
Top Layer:
  region net RE1: 1330,2325 1350,2345 1310,2345
  region net CE0: 1370,1715 1385,1730 1385,1699.35
  region net RE0: 1253.54,1850 1268.54,1865 1270,1865 1270,1830

## Silkscreen, mask and mechanical layers (free items; w line width, h text height)
Top Overlay:
  text "D9" at 3460,2135 h20 r90
  text "D8" at 3460,2035 h20 r90
  text "A5" at 3460,1935 h20 r90
  text "A4" at 3460,1835 h20 r90

## Text inside footprints (layer, text, board x,y; h text height)
J2: Assembly Notes "PCB Edge" at 3544.92,2543.82 h20 r90